# Altium PCB PCB1.PcbDoc (part 2 of 8)
Units mil, origin at the board's own origin, x right, y up, seen from the top; angles counter-clockwise.
Board outline 1968.5 x 1968.5 mil, 4 copper layers (Top Layer, Layer 1, Layer 2, Bottom Layer), stack 23.756 mil thick; 223 components, 143 nets, 652 pads, 329 vias.
Unrouted connection lines stored in the file: 15.
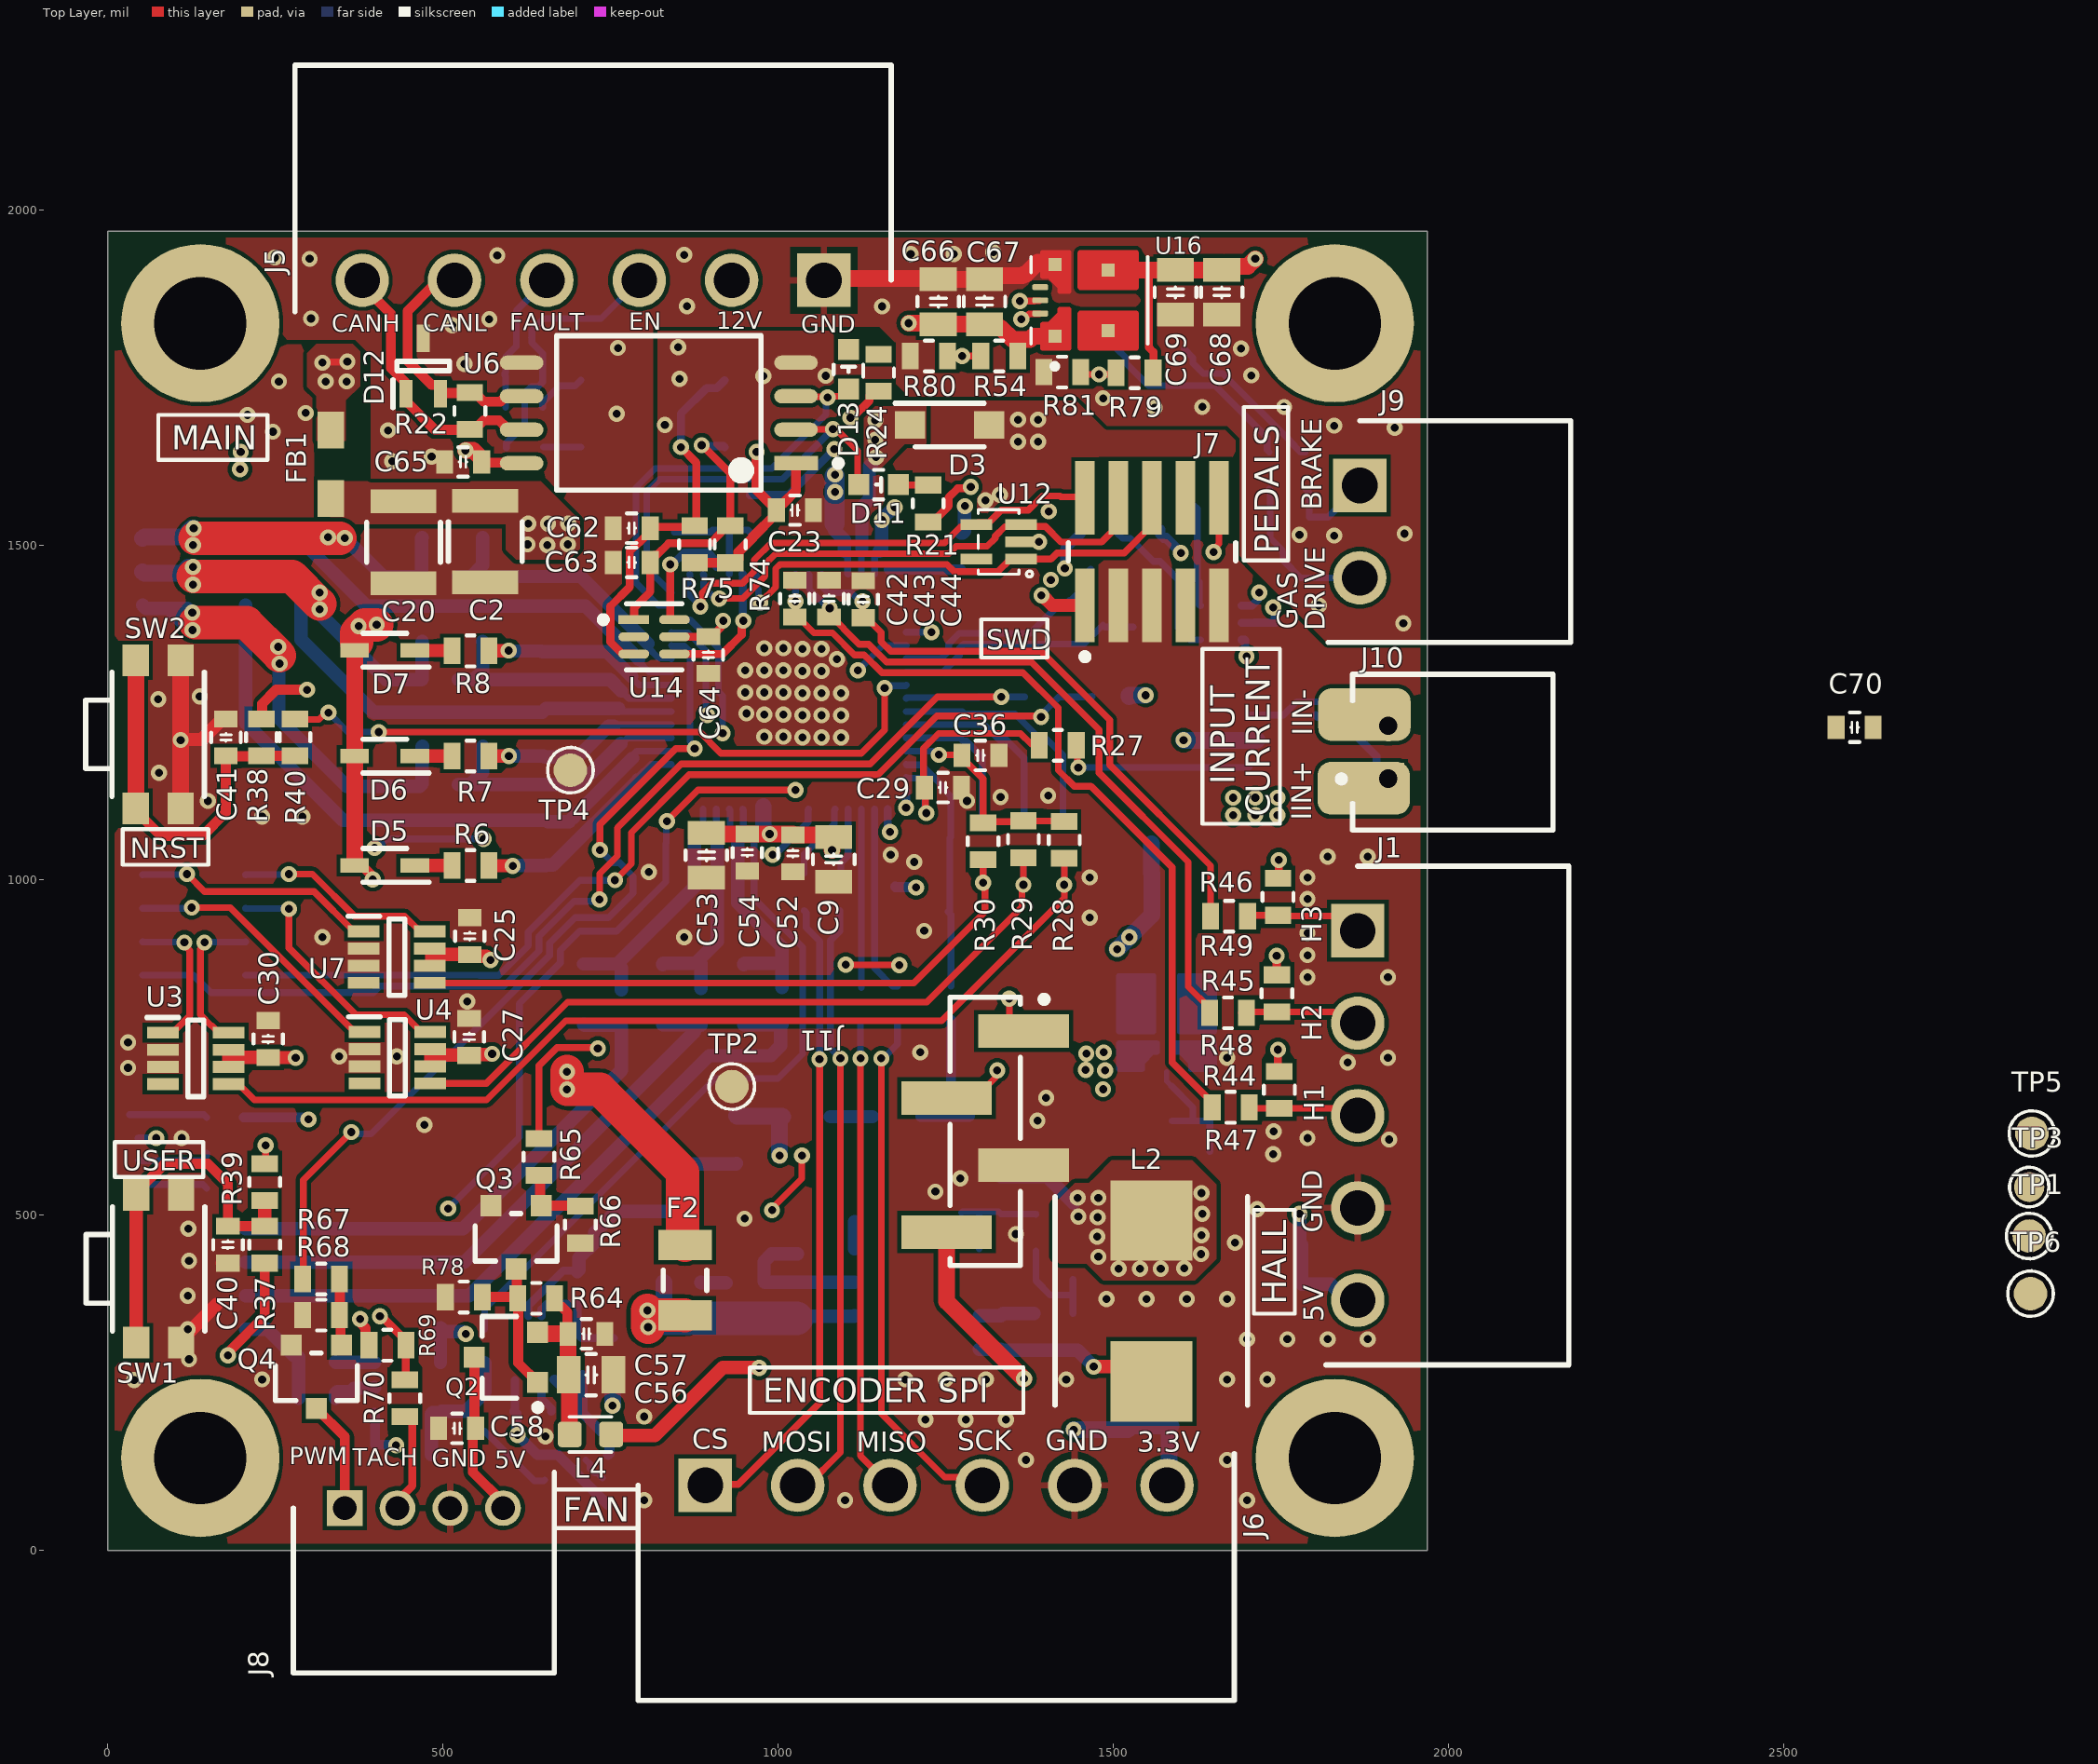
[diagram p0: Top Layer view]

## Part data (continued)
C14 C16 C17 C66 C68 C69: library part GMC21X5R226K16NT, "Ceramic Capacitor, Multilayer, Ceramic, 16V, 10% +Tol, 10% -Tol, X5R, 15% TC, 22uF, Surface Mount, 0805", Arrow Part Number=GRM21BZ71E475KE15L, Case Code (Imperial)=0805, Case Code (Metric)=2012, Dielectric=X7R, Dielectric Material=Ceramic, Manufacturer=Murata, Manufacturer Lifecycle Status="IN PRODUCTION", Manufacturer_Name="Murata Electronics", Max Operating Temperature=125°C, Min Operating Temperature=-55°C, Mouser Part Number=81-GRM21BZ71E475KE5L, Ratings=AEC-Q200, Supplier Part Number=2478136, Tolerance=10%, Voltage=100V, Voltage Rating=25V, Arrow Price/Stock=https://www.arrow.com/en/products/grm21bz71e475ke15l/murata-manufacturing?utm_currency=USD&region=nac, Case/Package=0805, Category="Ceramic Capacitors", China RoHS=Compliant, ComponentLink1Description=https://datasheet.octopart.com:443/GRM21BZ71E475KE15L-Murata-datasheet-155345087.pdf?src-supplier=Newark, ComponentLink1URL=https://datasheet.octopart.com:443/GRM21BZ71E475KE15L-Murata-datasheet-155345087.pdf?src-supplier=Newark, ComponentLink2Description=https://datasheet.octopart.com:443/GRM21BZ71E475KE15L-Murata-datasheet-141278877.pdf?src-supplier=Geoflip, ComponentLink2URL=https://datasheet.octopart.com:443/GRM21BZ71E475KE15L-Murata-datasheet-141278877.pdf?src-supplier=Geoflip, ComponentLink3Description=https://datasheet.octopart.com:443/GRM21BZ71E475KE15L-Murata-datasheet-165579666.pdf?src-supplier=TME, ComponentLink3URL=https://datasheet.octopart.com:443/GRM21BZ71E475KE15L-Murata-datasheet-165579666.pdf?src-supplier=TME, ComponentLink4Description=https://datasheet.octopart.com:443/GRM21BZ71E475KE15L-Murata-datasheet-140707839.pdf?src-supplier=Ciiva, ComponentLink4URL=https://datasheet.octopart.com:443/GRM21BZ71E475KE15L-Murata-datasheet-140707839.pdf?src-supplier=Ciiva, ComponentLink5Description=https://datasheet.octopart.com:443/GRM21BZ71E475KE15L-Murata-datasheet-138745135.pdf?src-supplier=Ciiva, ComponentLink5URL=https://datasheet.octopart.com:443/GRM21BZ71E475KE15L-Murata-datasheet-138745135.pdf?src-supplier=Ciiva, ComponentLink6Description=http://sigma.octopart.com:80/reach_statement/Murata-company-16.pdf?src-supplier=Compliance+Statements, ComponentLink6URL=http://sigma.octopart.com:80/reach_statement/Murata-company-16.pdf?src-supplier=Compliance+Statements, ComponentLink7Description=https://datasheet.octopart.com:443/GCM21BR72A104KA37L-Murata-datasheet-11892581.pdf?src-supplier=Upverter, ComponentLink7URL=https://datasheet.octopart.com:443/GCM21BR72A104KA37L-Murata-datasheet-11892581.pdf?src-supplier=Upverter, ComponentLink8Description=https://datasheet.octopart.com:443/GCM21BR72A104KA37L-Murata-datasheet-44104646.pdf?src-supplier=Upverter, ComponentLink8URL=https://datasheet.octopart.com:443/GCM21BR72A104KA37L-Murata-datasheet-44104646.pdf?src-supplier=Upverter, ComponentLink9Description=https://datasheet.octopart.com:443/GCM21BR72A104KA37L-Murata-datasheet-39128458.pdf?src-supplier=Newark, ComponentLink9URL=https://datasheet.octopart.com:443/GCM21BR72A104KA37L-Murata-datasheet-39128458.pdf?src-supplier=Newark, ComponentLink10Description=https://datasheet.octopart.com:443/GCM21BR72A104KA37L-Murata-datasheet-62316969.pdf?src-supplier=element14+APAC, ComponentLink10URL=https://datasheet.octopart.com:443/GCM21BR72A104KA37L-Murata-datasheet-62316969.pdf?src-supplier=element14+APAC, ComponentLink11Description=https://datasheet.octopart.com:443/GCM21BR72A104KA37L-Murata-datasheet-141268735.pdf?src-supplier=Geoflip, ComponentLink11URL=https://datasheet.octopart.com:443/GCM21BR72A104KA37L-Murata-datasheet-141268735.pdf?src-supplier=Geoflip, ComponentLink12Description=https://datasheet.octopart.com:443/GCM21BR72A104KA37L-Murata-datasheet-8331919.pdf?src-supplier=_legacy+Avnet, ComponentLink12URL=https://datasheet.octopart.com:443/GCM21BR72A104KA37L-Murata-datasheet-8331919.pdf?src-supplier=_legacy+Avnet, ComponentLink13Description=https://datasheet.octopart.com/GCM21BR72A104KA37L-Murata-datasheet-12553283.pdf, ComponentLink13URL=https://datasheet.octopart.com/GCM21BR72A104KA37L-Murata-datasheet-12553283.pdf, ComponentLink14Description=https://datasheet.octopart.com:443/GCM21BR72A104KA37L-Murata-datasheet-165579661.pdf?src-supplier=TME, ComponentLink14URL=https://datasheet.octopart.com:443/GCM21BR72A104KA37L-Murata-datasheet-165579661.pdf?src-supplier=TME, ComponentLink15Description=https://datasheet.octopart.com:443/GCM21BR72A104KA37L-Murata-datasheet-62117434.pdf?src-supplier=TME, ComponentLink15URL=https://datasheet.octopart.com:443/GCM21BR72A104KA37L-Murata-datasheet-62117434.pdf?src-supplier=TME, ComponentLink16Description=https://datasheet.octopart.com:443/GCM21BR72A104KA37L-Murata-datasheet-145011519.pdf?src-supplier=Megastar, ComponentLink16URL=https://datasheet.octopart.com:443/GCM21BR72A104KA37L-Murata-datasheet-145011519.pdf?src-supplier=Megastar, ComponentLink17Description=https://datasheet.octopart.com:443/GCM21BR72A104KA37L-Murata-datasheet-140660374.pdf?src-supplier=Ciiva, ComponentLink17URL=https://datasheet.octopart.com:443/GCM21BR72A104KA37L-Murata-datasheet-140660374.pdf?src-supplier=Ciiva, ComponentLink18Description=https://datasheet.octopart.com:443/GCM21BR72A104KA37L-Murata-datasheet-138719697.pdf?src-supplier=Ciiva, ComponentLink18URL=https://datasheet.octopart.com:443/GCM21BR72A104KA37L-Murata-datasheet-138719697.pdf?src-supplier=Ciiva, ComponentLink19Description=https://datasheet.octopart.com:443/GRM21BC71E106KE01L-Murata-datasheet-165579666.pdf?src-supplier=TME, ComponentLink19URL=https://datasheet.octopart.com:443/GRM21BC71E106KE01L-Murata-datasheet-165579666.pdf?src-supplier=TME, ComponentLink20Description=https://datasheet.octopart.com/GRM21BC71E106KE01L-Murata-datasheet-12515295.pdf, ComponentLink20URL=https://datasheet.octopart.com/GRM21BC71E106KE01L-Murata-datasheet-12515295.pdf, ComponentLink21Description=https://datasheet.octopart.com/GRM21BC71E106KE01L-Murata-datasheet-12510076.pdf, ComponentLink21URL=https://datasheet.octopart.com/GRM21BC71E106KE01L-Murata-datasheet-12510076.pdf, ComponentLink22Description=https://datasheet.octopart.com/GRM21BC71E106KE01L-Murata-datasheet-11978611.pdf, ComponentLink22URL=https://datasheet.octopart.com/GRM21BC71E106KE01L-Murata-datasheet-11978611.pdf, ComponentLink23Description=https://datasheet.octopart.com/GRM21BC71E106KE01L-Murata-datasheet-10025737.pdf, ComponentLink23URL=https://datasheet.octopart.com/GRM21BC71E106KE01L-Murata-datasheet-10025737.pdf, ComponentLink24Description=https://datasheet.octopart.com/GRM21BC71E106KE01L-Murata-datasheet-8819587.pdf, ComponentLink24URL=https://datasheet.octopart.com/GRM21BC71E106KE01L-Murata-datasheet-8819587.pdf, ComponentLink25Description=https://datasheet.octopart.com:443/GMC21X5R226K16NT-Cal-Chip-Electronics-datasheet-182028815.pdf?src-supplier=IHS, ComponentLink25URL=https://datasheet.octopart.com:443/GMC21X5R226K16NT-Cal-Chip-Electronics-datasheet-182028815.pdf?src-supplier=IHS, Country of Origin=Philippines, Datasheet Link=https://search.murata.co.jp/Ceramy/image/img/A01X/G101/ENG/GRM21BZ71E475KE15-01A.pdf, Depth=1.25mm, Export Control Classification Number (ECCN) Code=EAR99, Harmonized Tariff Schedule (HTS) Code=8532.24.00.20, Height=1.45mm, Introduction Date=2017-02-22, Lead Free="Lead Free", Length=2mm, Lifecycle Status=Production, Manufacturer Part Number=GRM21BZ71E475KE15L, Manufacturer_Part_Number=GRM21BZ71E475KE15L, Material=Ceramic, Mounting Technology="Surface Mount", Mouser Price/Stock=https://www.mouser.co.uk/ProductDetail/Murata-Electronics/GRM21BZ71E475KE15L?qs=Ey7%2FXF42M3feXnDNgc%252BFlQ%3D%3D, Number of Terminals=2, Packaging="Cut Tape", Pins=2, Pricing="24=0,1298, 50=0,1289, 100=0,1131, 500=0,0881, 1000=0,0646 (USD)", Radiation Hardening=No, REACH SVHC=Yes, RoHS=Compliant, Schedule B="8532240020, 8532240020|8532240020, 8532240020|8532240020|8532240020, 8532240020|8532240020|8532240020|8532240020", Stock=4700, Supplier=RS, Termination=SMD/SMT, Thickness=1.25mm, Voltage Rating (DC)=25V, Width=1.25mm
C15 C67: library part GCM21BR72A104KA37L, "100V 100nF X7R ±10% 0805 Multilayer Ceramic Capacitors MLCC - SMD/SMT ROHS", Arrow Part Number=GRM21BZ71E475KE15L, Case Code (Imperial)=0805, Case Code (Metric)=2012, Dielectric=X7R, Dielectric Material=Ceramic, Manufacturer=Murata, Manufacturer Lifecycle Status="IN PRODUCTION", Manufacturer_Name="Murata Electronics", Max Operating Temperature=125°C, Min Operating Temperature=-55°C, Mouser Part Number=81-GRM21BZ71E475KE5L, Ratings=AEC-Q200, Supplier Part Number=2478136, Tolerance=10%, Voltage=100V, Voltage Rating=25V, Arrow Price/Stock=https://www.arrow.com/en/products/grm21bz71e475ke15l/murata-manufacturing?utm_currency=USD&region=nac, Case/Package=0805, Category="Ceramic Capacitors", ClassName=buck_12V, ComponentLink1Description=https://datasheet.octopart.com:443/GRM21BZ71E475KE15L-Murata-datasheet-155345087.pdf?src-supplier=Newark, ComponentLink1URL=https://datasheet.octopart.com:443/GRM21BZ71E475KE15L-Murata-datasheet-155345087.pdf?src-supplier=Newark, ComponentLink2Description=https://datasheet.octopart.com:443/GRM21BZ71E475KE15L-Murata-datasheet-141278877.pdf?src-supplier=Geoflip, ComponentLink2URL=https://datasheet.octopart.com:443/GRM21BZ71E475KE15L-Murata-datasheet-141278877.pdf?src-supplier=Geoflip, ComponentLink3Description=https://datasheet.octopart.com:443/GRM21BZ71E475KE15L-Murata-datasheet-165579666.pdf?src-supplier=TME, ComponentLink3URL=https://datasheet.octopart.com:443/GRM21BZ71E475KE15L-Murata-datasheet-165579666.pdf?src-supplier=TME, ComponentLink4Description=https://datasheet.octopart.com:443/GRM21BZ71E475KE15L-Murata-datasheet-140707839.pdf?src-supplier=Ciiva, ComponentLink4URL=https://datasheet.octopart.com:443/GRM21BZ71E475KE15L-Murata-datasheet-140707839.pdf?src-supplier=Ciiva, ComponentLink5Description=https://datasheet.octopart.com:443/GRM21BZ71E475KE15L-Murata-datasheet-138745135.pdf?src-supplier=Ciiva, ComponentLink5URL=https://datasheet.octopart.com:443/GRM21BZ71E475KE15L-Murata-datasheet-138745135.pdf?src-supplier=Ciiva, ComponentLink6Description=http://sigma.octopart.com:80/reach_statement/Murata-company-16.pdf?src-supplier=Compliance+Statements, ComponentLink6URL=http://sigma.octopart.com:80/reach_statement/Murata-company-16.pdf?src-supplier=Compliance+Statements, ComponentLink7Description=https://datasheet.octopart.com:443/GCM21BR72A104KA37L-Murata-datasheet-11892581.pdf?src-supplier=Upverter, ComponentLink7URL=https://datasheet.octopart.com:443/GCM21BR72A104KA37L-Murata-datasheet-11892581.pdf?src-supplier=Upverter, ComponentLink8Description=https://datasheet.octopart.com:443/GCM21BR72A104KA37L-Murata-datasheet-44104646.pdf?src-supplier=Upverter, ComponentLink8URL=https://datasheet.octopart.com:443/GCM21BR72A104KA37L-Murata-datasheet-44104646.pdf?src-supplier=Upverter, ComponentLink9Description=https://datasheet.octopart.com:443/GCM21BR72A104KA37L-Murata-datasheet-39128458.pdf?src-supplier=Newark, ComponentLink9URL=https://datasheet.octopart.com:443/GCM21BR72A104KA37L-Murata-datasheet-39128458.pdf?src-supplier=Newark, ComponentLink10Description=https://datasheet.octopart.com:443/GCM21BR72A104KA37L-Murata-datasheet-62316969.pdf?src-supplier=element14+APAC, ComponentLink10URL=https://datasheet.octopart.com:443/GCM21BR72A104KA37L-Murata-datasheet-62316969.pdf?src-supplier=element14+APAC, ComponentLink11Description=https://datasheet.octopart.com:443/GCM21BR72A104KA37L-Murata-datasheet-141268735.pdf?src-supplier=Geoflip, ComponentLink11URL=https://datasheet.octopart.com:443/GCM21BR72A104KA37L-Murata-datasheet-141268735.pdf?src-supplier=Geoflip, ComponentLink12Description=https://datasheet.octopart.com:443/GCM21BR72A104KA37L-Murata-datasheet-8331919.pdf?src-supplier=_legacy+Avnet, ComponentLink12URL=https://datasheet.octopart.com:443/GCM21BR72A104KA37L-Murata-datasheet-8331919.pdf?src-supplier=_legacy+Avnet, ComponentLink13Description=https://datasheet.octopart.com/GCM21BR72A104KA37L-Murata-datasheet-12553283.pdf, ComponentLink13URL=https://datasheet.octopart.com/GCM21BR72A104KA37L-Murata-datasheet-12553283.pdf, ComponentLink14Description=https://datasheet.octopart.com:443/GCM21BR72A104KA37L-Murata-datasheet-165579661.pdf?src-supplier=TME, ComponentLink14URL=https://datasheet.octopart.com:443/GCM21BR72A104KA37L-Murata-datasheet-165579661.pdf?src-supplier=TME, ComponentLink15Description=https://datasheet.octopart.com:443/GCM21BR72A104KA37L-Murata-datasheet-62117434.pdf?src-supplier=TME, ComponentLink15URL=https://datasheet.octopart.com:443/GCM21BR72A104KA37L-Murata-datasheet-62117434.pdf?src-supplier=TME, ComponentLink16Description=https://datasheet.octopart.com:443/GCM21BR72A104KA37L-Murata-datasheet-145011519.pdf?src-supplier=Megastar, ComponentLink16URL=https://datasheet.octopart.com:443/GCM21BR72A104KA37L-Murata-datasheet-145011519.pdf?src-supplier=Megastar, ComponentLink17Description=https://datasheet.octopart.com:443/GCM21BR72A104KA37L-Murata-datasheet-140660374.pdf?src-supplier=Ciiva, ComponentLink17URL=https://datasheet.octopart.com:443/GCM21BR72A104KA37L-Murata-datasheet-140660374.pdf?src-supplier=Ciiva, ComponentLink18Description=https://datasheet.octopart.com:443/GCM21BR72A104KA37L-Murata-datasheet-138719697.pdf?src-supplier=Ciiva, ComponentLink18URL=https://datasheet.octopart.com:443/GCM21BR72A104KA37L-Murata-datasheet-138719697.pdf?src-supplier=Ciiva, Country of Origin=Philippines, Datasheet Link=https://search.murata.co.jp/Ceramy/image/img/A01X/G101/ENG/GRM21BZ71E475KE15-01A.pdf, Depth=1.25mm, Export Control Classification Number (ECCN) Code=EAR99, Harmonized Tariff Schedule (HTS) Code=8532.24.00.20, Height=1.45mm, Introduction Date=2017-02-22, Lead Free="Lead Free", Length=2mm, Lifecycle Status=Production, Manufacturer Part Number=GRM21BZ71E475KE15L, Manufacturer_Part_Number=GRM21BZ71E475KE15L, Material=Ceramic, Mounting Technology="Surface Mount", Mouser Price/Stock=https://www.mouser.co.uk/ProductDetail/Murata-Electronics/GRM21BZ71E475KE15L?qs=Ey7%2FXF42M3feXnDNgc%252BFlQ%3D%3D, Number of Terminals=2, Packaging="Cut Tape", Pins=2, Radiation Hardening=No, REACH SVHC=Yes, RoHS=Compliant, Schedule B="8532240020, 8532240020|8532240020, 8532240020|8532240020|8532240020, 8532240020|8532240020|8532240020|8532240020", Stock=4700, Supplier=RS, Termination=SMD/SMT, Thickness=1.25mm, Voltage Rating (DC)=25V, Width=1.25mm
C18 C70: library part CC0603KRX7R8BB103, "Surface Mount Ceramic Multilayer Capacitor 0.01uF 10% X7R 25V 0603 Paper T/R", Arrow Part Number=GCM188R71E104JA57D, Case Code (Imperial)=0603, Case Code (Metric)=1608, Dielectric=X7R, Dielectric Material=Ceramic, Insulation Resistance=100GΩ, Manufacturer=Murata, Manufacturer Lifecycle Status=NRND, Manufacturer_Name="Murata Electronics", Max Operating Temperature=125°C, Min Operating Temperature=-55°C, Mouser Part Number=81-GCM188R71E104JAD, Ratings=AEC-Q200, Supplier Part Number=490-GCM188R71E104JA57DCT-ND, Tolerance=10%, Voltage=25V, Arrow Price/Stock=https://www.arrow.com/en/products/gcm188r71e104ja57d/murata-manufacturing, Case/Package=0603, Category="Ceramic Capacitors", China RoHS=Compliant, ComponentLink1Description=https://datasheet.octopart.com:443/GCM188R71E104JA57D-Murata-datasheet-141267551.pdf?src-supplier=Geoflip, ComponentLink1URL=https://datasheet.octopart.com:443/GCM188R71E104JA57D-Murata-datasheet-141267551.pdf?src-supplier=Geoflip, ComponentLink2Description=https://datasheet.octopart.com:443/GCM188R71E104JA57D-Murata-datasheet-140658663.pdf?src-supplier=Ciiva, ComponentLink2URL=https://datasheet.octopart.com:443/GCM188R71E104JA57D-Murata-datasheet-140658663.pdf?src-supplier=Ciiva, ComponentLink3Description=https://datasheet.octopart.com:443/GCM188R71E104JA57D-Murata-datasheet-138718229.pdf?src-supplier=Ciiva, ComponentLink3URL=https://datasheet.octopart.com:443/GCM188R71E104JA57D-Murata-datasheet-138718229.pdf?src-supplier=Ciiva, ComponentLink4Description=http://sigma.octopart.com:80/reach_statement/Murata-company-16.pdf?src-supplier=Compliance+Statements, ComponentLink4URL=http://sigma.octopart.com:80/reach_statement/Murata-company-16.pdf?src-supplier=Compliance+Statements, ComponentLink5Description=https://datasheet.octopart.com:443/CC0603KRX7R8BB103-Yageo-datasheet-177165144.pdf?src-supplier=IHS, ComponentLink5URL=https://datasheet.octopart.com:443/CC0603KRX7R8BB103-Yageo-datasheet-177165144.pdf?src-supplier=IHS, ComponentLink6Description=https://datasheet.octopart.com:443/CC0603KRX7R8BB103-Yageo-datasheet-82288757.pdf?src-supplier=Upverter, ComponentLink6URL=https://datasheet.octopart.com:443/CC0603KRX7R8BB103-Yageo-datasheet-82288757.pdf?src-supplier=Upverter, ComponentLink7Description=https://datasheet.octopart.com/CC0603KRX7R8BB103-Yageo-datasheet-10883670.pdf, ComponentLink7URL=https://datasheet.octopart.com/CC0603KRX7R8BB103-Yageo-datasheet-10883670.pdf, ComponentLink8Description=https://datasheet.octopart.com:443/CC0603KRX7R8BB103-Yageo-datasheet-181968690.pdf?src-supplier=Newark, ComponentLink8URL=https://datasheet.octopart.com:443/CC0603KRX7R8BB103-Yageo-datasheet-181968690.pdf?src-supplier=Newark, ComponentLink9Description=https://datasheet.octopart.com:443/CC0603KRX7R8BB103-Yageo-datasheet-147453679.pdf?src-supplier=Newark, ComponentLink9URL=https://datasheet.octopart.com:443/CC0603KRX7R8BB103-Yageo-datasheet-147453679.pdf?src-supplier=Newark, ComponentLink10Description=https://datasheet.octopart.com:443/CC0603KRX7R8BB103-Phycomp-datasheet-499490.pdf?src-supplier=Newark, ComponentLink10URL=https://datasheet.octopart.com:443/CC0603KRX7R8BB103-Phycomp-datasheet-499490.pdf?src-supplier=Newark, ComponentLink11Description=https://datasheet.octopart.com:443/CC0603KRX7R8BB103-Yageo-datasheet-5301394.pdf?src-supplier=Newark, ComponentLink11URL=https://datasheet.octopart.com:443/CC0603KRX7R8BB103-Yageo-datasheet-5301394.pdf?src-supplier=Newark, ComponentLink12Description=https://datasheet.octopart.com:443/CC0603KRX7R8BB103-Yageo-datasheet-62336348.pdf?src-supplier=Farnell, ComponentLink12URL=https://datasheet.octopart.com:443/CC0603KRX7R8BB103-Yageo-datasheet-62336348.pdf?src-supplier=Farnell, ComponentLink13Description=https://datasheet.octopart.com:443/CC0603KRX7R8BB103-Phycomp-datasheet-500777.pdf?src-supplier=Farnell, ComponentLink13URL=https://datasheet.octopart.com:443/CC0603KRX7R8BB103-Phycomp-datasheet-500777.pdf?src-supplier=Farnell, ComponentLink14Description=https://datasheet.octopart.com:443/CC0603KRX7R8BB103-Yageo-datasheet-151948686.pdf?src-supplier=TME, ComponentLink14URL=https://datasheet.octopart.com:443/CC0603KRX7R8BB103-Yageo-datasheet-151948686.pdf?src-supplier=TME, ComponentLink15Description=https://datasheet.octopart.com:443/CC0603KRX7R8BB103-Yageo-Group-datasheet-184163374.pdf?src-supplier=LCSC, ComponentLink15URL=https://datasheet.octopart.com:443/CC0603KRX7R8BB103-Yageo-Group-datasheet-184163374.pdf?src-supplier=LCSC, ComponentLink16Description=https://datasheet.octopart.com:443/CC0603KRX7R8BB103-Yageo-datasheet-166511530.pdf?src-supplier=Future+Electronics, ComponentLink16URL=https://datasheet.octopart.com:443/CC0603KRX7R8BB103-Yageo-datasheet-166511530.pdf?src-supplier=Future+Electronics, ComponentLink17Description=https://datasheet.octopart.com:443/CC0603KRX7R8BB103-Yageo-datasheet-137700082.pdf?src-supplier=Future+Electronics, ComponentLink17URL=https://datasheet.octopart.com:443/CC0603KRX7R8BB103-Yageo-datasheet-137700082.pdf?src-supplier=Future+Electronics, ComponentLink18Description=https://datasheet.octopart.com:443/CC0603KRX7R8BB103-Yageo-datasheet-137700084.pdf?src-supplier=Future+Electronics, ComponentLink18URL=https://datasheet.octopart.com:443/CC0603KRX7R8BB103-Yageo-datasheet-137700084.pdf?src-supplier=Future+Electronics, ComponentLink19Description=https://datasheet.octopart.com:443/CC0603KRX7R8BB103-Yageo-datasheet-27626582.pdf?src-supplier=Future+Electronics, ComponentLink19URL=https://datasheet.octopart.com:443/CC0603KRX7R8BB103-Yageo-datasheet-27626582.pdf?src-supplier=Future+Electronics, ComponentLink20Description=https://datasheet.octopart.com:443/CC0603KRX7R8BB103-Yageo-datasheet-15895757.pdf?src-supplier=Future+Electronics, ComponentLink20URL=https://datasheet.octopart.com:443/CC0603KRX7R8BB103-Yageo-datasheet-15895757.pdf?src-supplier=Future+Electronics, ComponentLink21Description=https://datasheet.octopart.com:443/CC0603KRX7R8BB103-Yageo-datasheet-12526321.pdf?src-supplier=Future+Electronics, ComponentLink21URL=https://datasheet.octopart.com:443/CC0603KRX7R8BB103-Yageo-datasheet-12526321.pdf?src-supplier=Future+Electronics, ComponentLink22Description=https://datasheet.octopart.com:443/CC0603KRX7R8BB103-Yageo-datasheet-10911834.pdf?src-supplier=Future+Electronics, ComponentLink22URL=https://datasheet.octopart.com:443/CC0603KRX7R8BB103-Yageo-datasheet-10911834.pdf?src-supplier=Future+Electronics, ComponentLink23Description=https://datasheet.octopart.com:443/CC0603KRX7R8BB103-Yageo-datasheet-8324442.pdf?src-supplier=Future+Electronics, ComponentLink23URL=https://datasheet.octopart.com:443/CC0603KRX7R8BB103-Yageo-datasheet-8324442.pdf?src-supplier=Future+Electronics, ComponentLink24Description=https://datasheet.octopart.com:443/CC0603KRX7R8BB103-Yageo-Group-datasheet-165992755.pdf?src-supplier=ODG+(Origin+Data+Global), ComponentLink24URL=https://datasheet.octopart.com:443/CC0603KRX7R8BB103-Yageo-Group-datasheet-165992755.pdf?src-supplier=ODG+(Origin+Data+Global), ComponentLink25Description=https://datasheet.octopart.com:443/CC0603KRX7R8BB103-Yageo-datasheet-8701427.pdf?src-supplier=element14, ComponentLink25URL=https://datasheet.octopart.com:443/CC0603KRX7R8BB103-Yageo-datasheet-8701427.pdf?src-supplier=element14, ComponentLink26Description=http://sigma.octopart.com:80/conflict_mineral_statement/Yageo-company-3.pdf?src-supplier=Compliance+Statements, ComponentLink26URL=http://sigma.octopart.com:80/conflict_mineral_statement/Yageo-company-3.pdf?src-supplier=Compliance+Statements, ComponentLink27Description=http://sigma.octopart.com:80/rohs_statement/Yageo-company-2.pdf?src-supplier=Compliance+Statements, ComponentLink27URL=http://sigma.octopart.com:80/rohs_statement/Yageo-company-2.pdf?src-supplier=Compliance+Statements, Composition=Ceramic, Country of Origin=Philippines, Datasheet Link=https://search.murata.co.jp/Ceramy/image/img/A01X/G101/ENG/GCM188R71E104JA57-01A.pdf, Depth=800µm, Export Control Classification Number (ECCN) Code=EAR99, Halogen Free="Halogen Free", Harmonized Tariff Schedule (HTS) Code=8532.24.00.20, Height=0.9mm, Introduction Date=2013-11-20, Lead Free="Lead Free", Length=1.6mm, Lifecycle Status=NRND, Manufacturer Part Number=GCM188R71E104JA57D, Manufacturer_Part_Number=GCM188R71E104JA57D, Material=Ceramic, Mounting Technology="Surface Mount", Mouser Price/Stock=https://www.mouser.co.uk/ProductDetail/Murata-Electronics/GCM188R71E104JA57D?qs=ui%252B2d9lVEI5lLkZDVYlCng%3D%3D, Number of Terminals=2, Pins=2, Pricing="1=0,33, 10=0,196, 50=0,1434, 100=0,1272, 500=0,09986, 1000=0,09143 (USD)", Radiation Hardening=No, REACH SVHC=Yes, RoHS=Compliant, Schedule B="8532240020, 8532240020|8532240020|8532240020|8532240020|8532240020", Stock=2875, Supplier=DigiKey, Termination=SMD/SMT, Thickness=800µm, Voltage Rating=25V, Voltage Rating (DC)=25V, Width=800µm
C22 C52 C54 C55: library part GCM188R71E105KA64D, "25V 1uF X7R ±10% 0603 Multilayer Ceramic Capacitors MLCC - SMD/SMT ROHS", Arrow Part Number=GCM188R71E104JA57D, Case Code (Imperial)=0603, Case Code (Metric)=1608, Dielectric=X7R, Dielectric Material=Ceramic, Manufacturer=Murata, Manufacturer Lifecycle Status=NRND, Manufacturer_Name="Murata Electronics", Max Operating Temperature=125°C, Min Operating Temperature=-55°C, Mouser Part Number=81-GCM188R71E104JAD, Ratings=AEC-Q200, Supplier Part Number=490-GCM188R71E104JA57DCT-ND, Tolerance=10%, Voltage=25V, Arrow Price/Stock=https://www.arrow.com/en/products/gcm188r71e104ja57d/murata-manufacturing, Case/Package=0603, Category="Ceramic Capacitors", ComponentLink1Description=https://datasheet.octopart.com:443/GCM188R71E104JA57D-Murata-datasheet-141267551.pdf?src-supplier=Geoflip, ComponentLink1URL=https://datasheet.octopart.com:443/GCM188R71E104JA57D-Murata-datasheet-141267551.pdf?src-supplier=Geoflip, ComponentLink2Description=https://datasheet.octopart.com:443/GCM188R71E104JA57D-Murata-datasheet-140658663.pdf?src-supplier=Ciiva, ComponentLink2URL=https://datasheet.octopart.com:443/GCM188R71E104JA57D-Murata-datasheet-140658663.pdf?src-supplier=Ciiva, ComponentLink3Description=https://datasheet.octopart.com:443/GCM188R71E104JA57D-Murata-datasheet-138718229.pdf?src-supplier=Ciiva, ComponentLink3URL=https://datasheet.octopart.com:443/GCM188R71E104JA57D-Murata-datasheet-138718229.pdf?src-supplier=Ciiva, ComponentLink4Description=http://sigma.octopart.com:80/reach_statement/Murata-company-16.pdf?src-supplier=Compliance+Statements, ComponentLink4URL=http://sigma.octopart.com:80/reach_statement/Murata-company-16.pdf?src-supplier=Compliance+Statements, ComponentLink5Description=https://datasheet.octopart.com:443/GCM188R71E105KA64D-Murata-datasheet-39128443.pdf?src-supplier=Newark, ComponentLink5URL=https://datasheet.octopart.com:443/GCM188R71E105KA64D-Murata-datasheet-39128443.pdf?src-supplier=Newark, ComponentLink6Description=https://datasheet.octopart.com:443/GCM188R71E105KA64D-Murata-datasheet-62316951.pdf?src-supplier=element14+APAC, ComponentLink6URL=https://datasheet.octopart.com:443/GCM188R71E105KA64D-Murata-datasheet-62316951.pdf?src-supplier=element14+APAC, ComponentLink7Description=https://datasheet.octopart.com:443/GCM188R71E105KA64D-Murata-datasheet-141267554.pdf?src-supplier=Geoflip, ComponentLink7URL=https://datasheet.octopart.com:443/GCM188R71E105KA64D-Murata-datasheet-141267554.pdf?src-supplier=Geoflip, ComponentLink8Description=https://datasheet.octopart.com:443/GCM188R71E105KA64D-Murata-datasheet-140658666.pdf?src-supplier=Ciiva, ComponentLink8URL=https://datasheet.octopart.com:443/GCM188R71E105KA64D-Murata-datasheet-140658666.pdf?src-supplier=Ciiva, ComponentLink9Description=https://datasheet.octopart.com:443/GCM188R71E105KA64D-Murata-datasheet-138718232.pdf?src-supplier=Ciiva, ComponentLink9URL=https://datasheet.octopart.com:443/GCM188R71E105KA64D-Murata-datasheet-138718232.pdf?src-supplier=Ciiva, ComponentLink10Description=https://datasheet.octopart.com:443/GCM188R71E105KA64D-Murata-datasheet-81455541.pdf?src-supplier=TME, ComponentLink10URL=https://datasheet.octopart.com:443/GCM188R71E105KA64D-Murata-datasheet-81455541.pdf?src-supplier=TME, ComponentLink11Description=https://datasheet.octopart.com/GCM188R71E105KA64D-Murata-datasheet-14404430.pdf, ComponentLink11URL=https://datasheet.octopart.com/GCM188R71E105KA64D-Murata-datasheet-14404430.pdf, ComponentLink12Description=https://datasheet.octopart.com:443/GCM188R71E105KA64D-Murata-datasheet-14393380.pdf?src-supplier=Future+Electronics, ComponentLink12URL=https://datasheet.octopart.com:443/GCM188R71E105KA64D-Murata-datasheet-14393380.pdf?src-supplier=Future+Electronics, ComponentLink13Description=https://datasheet.octopart.com:443/GCM188R71E105KA64D-Murata-datasheet-44103482.pdf?src-supplier=Future+Electronics, ComponentLink13URL=https://datasheet.octopart.com:443/GCM188R71E105KA64D-Murata-datasheet-44103482.pdf?src-supplier=Future+Electronics, Country of Origin=Philippines, Datasheet Link=https://search.murata.co.jp/Ceramy/image/img/A01X/G101/ENG/GCM188R71E104JA57-01A.pdf, Depth=800µm, Export Control Classification Number (ECCN) Code=EAR99, Harmonized Tariff Schedule (HTS) Code=8532.24.00.20, Height=0.9mm, Introduction Date=2013-11-20, Lead Free="Lead Free", Length=1.6mm, Lifecycle Status=NRND, Manufacturer Part Number=GCM188R71E104JA57D, Manufacturer_Part_Number=GCM188R71E104JA57D, Material=Ceramic, Mounting Technology="Surface Mount", Mouser Price/Stock=https://www.mouser.co.uk/ProductDetail/Murata-Electronics/GCM188R71E104JA57D?qs=ui%252B2d9lVEI5lLkZDVYlCng%3D%3D, Number of Terminals=2, Packaging="Cut Tape", Pricing="1=0,33, 10=0,196, 50=0,1434, 100=0,1272, 500=0,09986, 1000=0,09143 (USD)", Radiation Hardening=No, REACH SVHC=Yes, RoHS=Compliant, Schedule B="8532240020, 8532240020|8532240020|8532240020|8532240020|8532240020", Stock=2875, Supplier=DigiKey, Termination=SMD/SMT, Thickness=800µm, Voltage Rating=25V, Voltage Rating (DC)=25V, Weight=6.293594mg, Width=800µm
C24 C26 C28 C29 C36 C45 C46 C47 C48 C57 C58 C59: library part C0603C222J3RACTU, "Ceramic Capacitor, Multilayer, Ceramic, 25V, 5% +Tol, 5% -Tol, X7R, 15% TC, 0.0022uF, Surface Mount, 0603", Arrow Part Number=GCM188R71E104JA57D, Case Code (Imperial)=0603, Case Code (Metric)=1608, Dielectric=X7R, Dielectric Material=Ceramic, Manufacturer=Murata, Manufacturer Lifecycle Status=NRND, Manufacturer_Name="Murata Electronics", Max Operating Temperature=125°C, Min Operating Temperature=-55°C, Mouser Part Number=81-GCM188R71E104JAD, Ratings=AEC-Q200, Supplier Part Number=490-GCM188R71E104JA57DCT-ND, Temperature Coefficient=30ppm/°C, Tolerance=5%, Voltage Rating=25V, Arrow Price/Stock=https://www.arrow.com/en/products/gcm188r71e104ja57d/murata-manufacturing, Case/Package=0603, Category="Ceramic Capacitors", China RoHS=Compliant, ComponentLink1Description=https://datasheet.octopart.com:443/GCM188R71E104JA57D-Murata-datasheet-141267551.pdf?src-supplier=Geoflip, ComponentLink1URL=https://datasheet.octopart.com:443/GCM188R71E104JA57D-Murata-datasheet-141267551.pdf?src-supplier=Geoflip, ComponentLink2Description=https://datasheet.octopart.com:443/GCM188R71E104JA57D-Murata-datasheet-140658663.pdf?src-supplier=Ciiva, ComponentLink2URL=https://datasheet.octopart.com:443/GCM188R71E104JA57D-Murata-datasheet-140658663.pdf?src-supplier=Ciiva, ComponentLink3Description=https://datasheet.octopart.com:443/GCM188R71E104JA57D-Murata-datasheet-138718229.pdf?src-supplier=Ciiva, ComponentLink3URL=https://datasheet.octopart.com:443/GCM188R71E104JA57D-Murata-datasheet-138718229.pdf?src-supplier=Ciiva, ComponentLink4Description=http://sigma.octopart.com:80/reach_statement/Murata-company-16.pdf?src-supplier=Compliance+Statements, ComponentLink4URL=http://sigma.octopart.com:80/reach_statement/Murata-company-16.pdf?src-supplier=Compliance+Statements, ComponentLink5Description=https://datasheet.octopart.com:443/C0603C222J3RACTU-KEMET-datasheet-178445679.pdf?src-supplier=IHS, ComponentLink5URL=https://datasheet.octopart.com:443/C0603C222J3RACTU-KEMET-datasheet-178445679.pdf?src-supplier=IHS, ComponentLink6Description=https://datasheet.octopart.com:443/C0603C222J3RACTU-KEMET-datasheet-137357764.pdf?src-supplier=Upverter, ComponentLink6URL=https://datasheet.octopart.com:443/C0603C222J3RACTU-KEMET-datasheet-137357764.pdf?src-supplier=Upverter, ComponentLink7Description=https://datasheet.octopart.com:443/C0603C222J3RACTU-KEMET-datasheet-157246124.pdf?src-supplier=Electro+Sonic, ComponentLink7URL=https://datasheet.octopart.com:443/C0603C222J3RACTU-KEMET-datasheet-157246124.pdf?src-supplier=Electro+Sonic, ComponentLink8Description=https://datasheet.octopart.com:443/C0603C222J3RACTU-KEMET-datasheet-37550250.pdf?src-supplier=Electro+Sonic, ComponentLink8URL=https://datasheet.octopart.com:443/C0603C222J3RACTU-KEMET-datasheet-37550250.pdf?src-supplier=Electro+Sonic, ComponentLink9Description=https://datasheet.octopart.com:443/C0603C222J3RACTU-KEMET-datasheet-189885750.pdf?src-supplier=element14+APAC, ComponentLink9URL=https://datasheet.octopart.com:443/C0603C222J3RACTU-KEMET-datasheet-189885750.pdf?src-supplier=element14+APAC, ComponentLink10Description=https://datasheet.octopart.com:443/C0603C222J3RACTU-KEMET-datasheet-149535057.pdf?src-supplier=Farnell, ComponentLink10URL=https://datasheet.octopart.com:443/C0603C222J3RACTU-KEMET-datasheet-149535057.pdf?src-supplier=Farnell, ComponentLink11Description=https://datasheet.octopart.com:443/C0603C222J3RACTU-KEMET-datasheet-137357759.pdf?src-supplier=Farnell, ComponentLink11URL=https://datasheet.octopart.com:443/C0603C222J3RACTU-KEMET-datasheet-137357759.pdf?src-supplier=Farnell, ComponentLink12Description=https://datasheet.octopart.com/C0603C222J3RACTU-KEMET-datasheet-84169754.pdf, ComponentLink12URL=https://datasheet.octopart.com/C0603C222J3RACTU-KEMET-datasheet-84169754.pdf, ComponentLink13Description=https://datasheet.octopart.com:443/C0603C222J3RACTU-Kemet-datasheet-11790729.pdf?src-supplier=Arrow+Electronics, ComponentLink13URL=https://datasheet.octopart.com:443/C0603C222J3RACTU-Kemet-datasheet-11790729.pdf?src-supplier=Arrow+Electronics, Country of Origin=Philippines, Datasheet Link=https://search.murata.co.jp/Ceramy/image/img/A01X/G101/ENG/GCM188R71E104JA57-01A.pdf, Depth=800µm, Dissipation Factor=10%, Export Control Classification Number (ECCN) Code=EAR99, Harmonized Tariff Schedule (HTS) Code=8532.24.00.20, Height=0.9mm, Introduction Date=2013-11-20, Lead Pitch=700µm, Length=1.6mm, Lifecycle Status=NRND, Manufacturer Part Number=GCM188R71E104JA57D, Manufacturer_Part_Number=GCM188R71E104JA57D, Material=Ceramic, Mounting Technology="Surface Mount", Mouser Price/Stock=https://www.mouser.co.uk/ProductDetail/Murata-Electronics/GCM188R71E104JA57D?qs=ui%252B2d9lVEI5lLkZDVYlCng%3D%3D, Number of Terminals=2, Pricing="1=0,33, 10=0,196, 50=0,1434, 100=0,1272, 500=0,09986, 1000=0,09143 (USD)", REACH SVHC=Yes, RoHS=Compliant, Schedule B="8532240020, 8532240020|8532240020|8532240020|8532240020|8532240020", Stock=2875, Supplier=DigiKey, Termination=SMD/SMT, Thickness=800µm, Voltage Rating (DC)=25V, Width=800µm
C39: library part GCM1885C1H222FA16D, "50V 2.2nF C0G ±1% 0603 Multilayer Ceramic Capacitors MLCC - SMD/SMT ROHS", Arrow Part Number=GCM188R71E104JA57D, Case/Package=0603, Dielectric Material=Ceramic, Manufacturer=Murata, Manufacturer Lifecycle Status=NRND, Manufacturer_Name="Murata Electronics", Max Operating Temperature=125°C, Min Operating Temperature=-55°C, Mouser Part Number=81-GCM188R71E104JAD, Ratings=AEC-Q200, Supplier Part Number=490-GCM188R71E104JA57DCT-ND, Temperature Coefficient=30ppm/°C, Tolerance=1%, Voltage Rating=50V, Voltage Rating (DC)=25V, Arrow Price/Stock=https://www.arrow.com/en/products/gcm188r71e104ja57d/murata-manufacturing, Category="Ceramic Capacitors", ComponentLink1Description=https://datasheet.octopart.com:443/GCM188R71E104JA57D-Murata-datasheet-141267551.pdf?src-supplier=Geoflip, ComponentLink1URL=https://datasheet.octopart.com:443/GCM188R71E104JA57D-Murata-datasheet-141267551.pdf?src-supplier=Geoflip, ComponentLink2Description=https://datasheet.octopart.com:443/GCM188R71E104JA57D-Murata-datasheet-140658663.pdf?src-supplier=Ciiva, ComponentLink2URL=https://datasheet.octopart.com:443/GCM188R71E104JA57D-Murata-datasheet-140658663.pdf?src-supplier=Ciiva, ComponentLink3Description=https://datasheet.octopart.com:443/GCM188R71E104JA57D-Murata-datasheet-138718229.pdf?src-supplier=Ciiva, ComponentLink3URL=https://datasheet.octopart.com:443/GCM188R71E104JA57D-Murata-datasheet-138718229.pdf?src-supplier=Ciiva, ComponentLink4Description=http://sigma.octopart.com:80/reach_statement/Murata-company-16.pdf?src-supplier=Compliance+Statements, ComponentLink4URL=http://sigma.octopart.com:80/reach_statement/Murata-company-16.pdf?src-supplier=Compliance+Statements, ComponentLink5Description=https://datasheet.octopart.com:443/GCM1885C1H222FA16D-Murata-datasheet-149522570.pdf?src-supplier=Newark, ComponentLink5URL=https://datasheet.octopart.com:443/GCM1885C1H222FA16D-Murata-datasheet-149522570.pdf?src-supplier=Newark, ComponentLink6Description=https://datasheet.octopart.com:443/GCM1885C1H222FA16D-Murata-datasheet-141266224.pdf?src-supplier=Ciiva, ComponentLink6URL=https://datasheet.octopart.com:443/GCM1885C1H222FA16D-Murata-datasheet-141266224.pdf?src-supplier=Ciiva, ComponentLink7Description=https://datasheet.octopart.com:443/GCM1885C1H222FA16D-Murata-datasheet-140656944.pdf?src-supplier=Ciiva, ComponentLink7URL=https://datasheet.octopart.com:443/GCM1885C1H222FA16D-Murata-datasheet-140656944.pdf?src-supplier=Ciiva, ComponentLink8Description=https://datasheet.octopart.com:443/GCM1885C1H222FA16D-Murata-datasheet-138716646.pdf?src-supplier=Ciiva, ComponentLink8URL=https://datasheet.octopart.com:443/GCM1885C1H222FA16D-Murata-datasheet-138716646.pdf?src-supplier=Ciiva, ComponentLink9Description=https://datasheet.octopart.com:443/GCM1885C1H222FA16D-Murata-datasheet-12511495.pdf?src-supplier=TME, ComponentLink9URL=https://datasheet.octopart.com:443/GCM1885C1H222FA16D-Murata-datasheet-12511495.pdf?src-supplier=TME, ComponentLink10Description=https://datasheet.octopart.com:443/GCM1885C1H222FA16D-Murata-datasheet-140568688.pdf?src-supplier=Arrow.cn, ComponentLink10URL=https://datasheet.octopart.com:443/GCM1885C1H222FA16D-Murata-datasheet-140568688.pdf?src-supplier=Arrow.cn, Country of Origin=Philippines, Datasheet Link=https://search.murata.co.jp/Ceramy/image/img/A01X/G101/ENG/GCM188R71E104JA57-01A.pdf, Export Control Classification Number (ECCN) Code=EAR99, Harmonized Tariff Schedule (HTS) Code=8532.24.00.20, Height=0.9mm, Introduction Date=2013-11-20, Length=1.6mm, Lifecycle Status=NRND, Manufacturer Part Number=GCM188R71E104JA57D, Manufacturer_Part_Number=GCM188R71E104JA57D, Material=Ceramic, Mounting Technology="Surface Mount", Mouser Price/Stock=https://www.mouser.co.uk/ProductDetail/Murata-Electronics/GCM188R71E104JA57D?qs=ui%252B2d9lVEI5lLkZDVYlCng%3D%3D, Number of Terminals=2, Pricing="1=0,33, 10=0,196, 50=0,1434, 100=0,1272, 500=0,09986, 1000=0,09143 (USD)", REACH SVHC=Yes, RoHS=Compliant, Schedule B="8532240020, 8532240020|8532240020|8532240020|8532240020|8532240020", Stock=2875, Supplier=DigiKey, Thickness=800µm, Width=800µm
D1 D2 D4 D5 D6 D7 D8 D9 D10: "Diode", Manufacturer_Name=STMicroelectronics, Mouser Part Number=511-BAT48JFILM, Arrow Part Number=BAT48JFILM, Arrow Price/Stock=https://www.arrow.com/en/products/bat48jfilm/stmicroelectronics.html?utm_currency=USD&region=nac, Datasheet Link=https://www.st.com/resource/en/datasheet/bat48.pdf, Height=1.17mm, Manufacturer_Part_Number=BAT48JFILM, Mouser Price/Stock=https://www.mouser.co.uk/ProductDetail/STMicroelectronics/BAT48JFILM?qs=jZi1jxfVU96ub22u%252BA2DtA%3D%3D
D3: "Schottky Diode", Manufacturer_Name=STMicroelectronics, Mouser Part Number=511-STPST1H100ZFY, Datasheet Link=https://www.st.com/resource/en/datasheet/stpst1h100-y.pdf, Height=1.1mm, Manufacturer_Part_Number=STPST1H100ZFY, Mouser Price/Stock=https://www.mouser.co.uk/ProductDetail/STMicroelectronics/STPST1H100ZFY?qs=Jm2GQyTW%2FbiCa1fy2WZ27w%3D%3D
D11: "Single-color LEDs; LITEON; LTST-C190KRKT; Red; 130 °; 2.4 V; 0603", Case Code (Imperial)=0603, Case Code (Metric)=1608, Color=Red, Forward Current=30mA, Forward Voltage=2.4V, Lens Color=Colorless, Manufacturer="Diodes Inc.", Max Operating Temperature=85°C, Min Operating Temperature=-55°C, Package Quantity=1, Power Dissipation=75mW, Reverse Voltage=5V, Test Current=20mA, Tolerance=20%, Voltage Rating=50V, Case/Package=0603, Category=LEDs, China RoHS=Compliant, ComponentLink1Description=https://datasheet.octopart.com:443/LTST-C190KRKT-Lite-On-datasheet-32047000.pdf?src-supplier=Upverter, ComponentLink1URL=https://datasheet.octopart.com:443/LTST-C190KRKT-Lite-On-datasheet-32047000.pdf?src-supplier=Upverter, ComponentLink2Description=https://datasheet.octopart.com:443/LTST-C190KRKT-Lite-On-datasheet-114749306.pdf?src-supplier=ODG+(Origin+Data+Global), ComponentLink2URL=https://datasheet.octopart.com:443/LTST-C190KRKT-Lite-On-datasheet-114749306.pdf?src-supplier=ODG+(Origin+Data+Global), ComponentLink3Description=https://datasheet.octopart.com:443/LTST-C190KRKT-Lite-On-datasheet-166650849.pdf?src-supplier=IHS, ComponentLink3URL=https://datasheet.octopart.com:443/LTST-C190KRKT-Lite-On-datasheet-166650849.pdf?src-supplier=IHS, ComponentLink4Description=https://datasheet.octopart.com:443/LTST-C190KRKT-Lite-On-datasheet-158191.pdf?src-supplier=_legacy+Avnet, ComponentLink4URL=https://datasheet.octopart.com:443/LTST-C190KRKT-Lite-On-datasheet-158191.pdf?src-supplier=_legacy+Avnet, ComponentLink5Description=https://datasheet.octopart.com:443/LTST-C190KRKT-Lite-On-datasheet-165573809.pdf?src-supplier=TME, ComponentLink5URL=https://datasheet.octopart.com:443/LTST-C190KRKT-Lite-On-datasheet-165573809.pdf?src-supplier=TME, ComponentLink6Description=https://datasheet.octopart.com:443/LTST-C190KRKT-Lite-On-datasheet-165573808.pdf?src-supplier=TME, ComponentLink6URL=https://datasheet.octopart.com:443/LTST-C190KRKT-Lite-On-datasheet-165573808.pdf?src-supplier=TME, ComponentLink7Description=https://datasheet.octopart.com:443/LTST-C190KRKT-Lite-On-datasheet-12557188.pdf?src-supplier=Future+Electronics, ComponentLink7URL=https://datasheet.octopart.com:443/LTST-C190KRKT-Lite-On-datasheet-12557188.pdf?src-supplier=Future+Electronics, ComponentLink8Description=https://datasheet.octopart.com:443/LTST-C190KRKT-Lite-On-datasheet-8329900.pdf?src-supplier=Future+Electronics, ComponentLink8URL=https://datasheet.octopart.com:443/LTST-C190KRKT-Lite-On-datasheet-8329900.pdf?src-supplier=Future+Electronics, ComponentLink9Description=https://datasheet.octopart.com:443/LTST-C190KRKT-Lite-On-datasheet-8319956.pdf?src-supplier=Jameco+(USA), ComponentLink9URL=https://datasheet.octopart.com:443/LTST-C190KRKT-Lite-On-datasheet-8319956.pdf?src-supplier=Jameco+(USA), ComponentLink10Description=https://datasheet.octopart.com:443/LTST-C190KRKT-Lite-On-datasheet-94958.pdf?src-supplier=DigiKey, ComponentLink10URL=https://datasheet.octopart.com:443/LTST-C190KRKT-Lite-On-datasheet-94958.pdf?src-supplier=DigiKey, Country of Origin="Mainland China", Depth=0.8mm, Diameter=8mm, Dominant Wavelength=631nm, Export Control Classification Number (ECCN) Code=EAR99, Harmonized Tariff Schedule (HTS) Code=8541.40.20.00, Height=0.8mm, Illumination Color=Red, Introduction Date=2000-01-01, Lead Free="Lead Free", Lead Pitch=3.5mm, Length=1.6mm, Lens Style=Diffused, Lens Transparency=Clear, Lifecycle Status=Production, Luminous Intensity=54mcd, Manufacturer Part Number=LTST-C190KRKT, Mount="Surface Mount", Mounting Technology="Surface Mount", Number of Circuits=1, Number of Elements=1, Number of LEDs=1, Number of Pins=2, Number of Terminals=2, Packaging="Tape and Reel", Peak Wavelength=639nm, Pins=2, Power Rating=75mW, Pricing="4000=0,0165, 12000=0,0161, 40000=0,0157, 80000=0,0155, 160000=0,0151 (USD)", Radiation Hardening=No, REACH SVHC=Yes, RoHS=Compliant, Schedule B="8541402000, 8541402000|8541402000, 8541402000|8541402000|8541402000, 8541402000|8541402000|8541402000|8541402000", Shape=Rectangular, Stock=1328000, Supplier="Future Electronics", Supplier Part Number=LTST-C190KRKT, Viewing Angle=130°, Voltage Rating (DC)=50V, Wavelength=639nm, Width=0.8mm
D12: "TVS Diode (Bi-directional)", Manufacturer_Name=STMicroelectronics, Mouser Part Number=511-ESDCAN04-2BWY, Arrow Part Number=ESDCAN04-2BWY, Arrow Price/Stock=https://www.arrow.com/en/products/esdcan04-2bwy/stmicroelectronics.html?utm_currency=USD&region=nac, Datasheet Link=https://www.st.com/resource/en/datasheet/esdcan03-2bwy.pdf, Height=1.1mm, Manufacturer_Part_Number=ESDCAN04-2BWY, Mouser Price/Stock=https://www.mouser.co.uk/ProductDetail/STMicroelectronics/ESDCAN04-2BWY?qs=l7cgNqFNU1hwAv7A5GPlKQ%3D%3D